# Altium PCB DPM20140124.PcbDoc (part 3 of 3)
Units mil, origin at the board's own origin, x right, y up, seen from the top; angles counter-clockwise.
Board outline 4950 x 7375 mil, 2 copper layers (Top Layer, Bottom Layer); 198 components, 330 nets, 1077 pads, 152 vias.
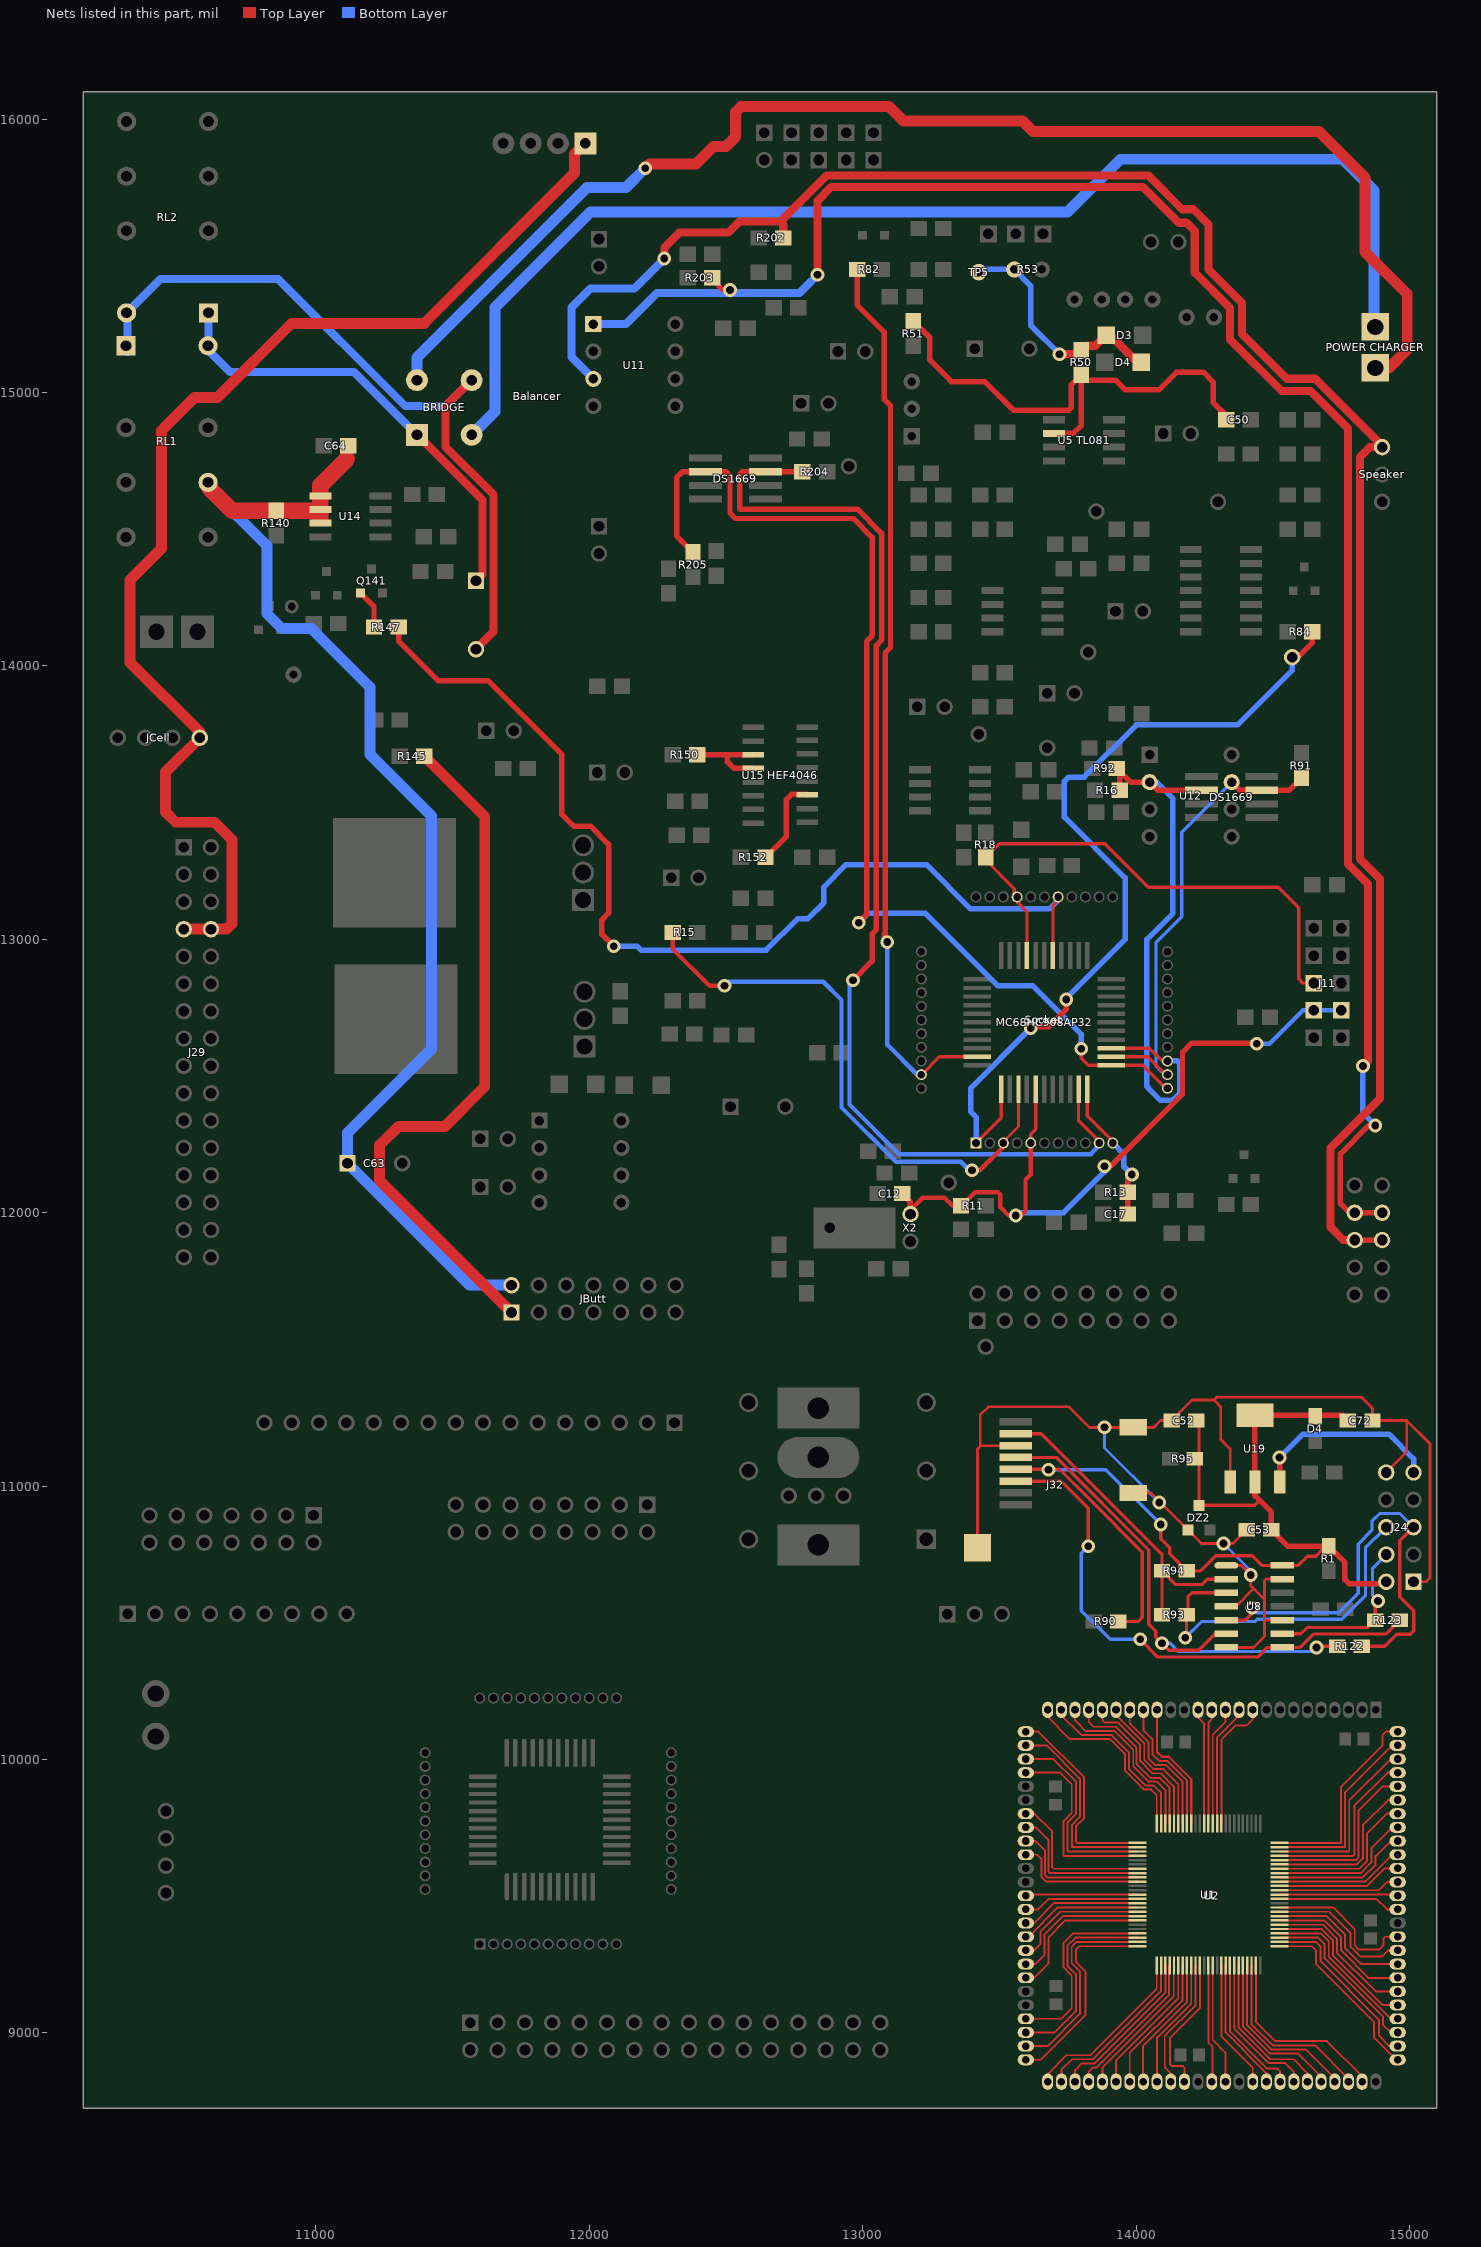
[diagram p3: the nets of this part, all layers, seen from the top]

## Via types
v1: diameter 50, hole 28, Top Layer to Bottom Layer, 152 vias

## Nets (pads, with @x,y where several pads share a name; then routed paths per layer and width w, separated by ;. In a path a pad name is that pad's centre, name@x,y a point inside that pad or via, vN(x,y) a via of type N, cw(c..) or ccw(c..) an arc to the next point about the centre after c; other vN are vias at no path point) (continued)
NetU1_10: U1.10 U2.10 | length 486.9
  Top Layer w7: U1.10@14312.09,9766.09 14312.09,10072.09 14365,10125 14405,10125 14427,10147 U2.10@14427,10182
NetU1_11: U1.11 U2.11 | length 449.3
  Top Layer w7: U1.11@14296.34,9766.09 14296.34,10081.34 14377,10162 U2.11@14377,10182
NetU1_12: U1.12 U2.12 | length 435.1
  Top Layer w7: U1.12@14280.59,9766.09 14280.59,10090.59 14327,10137 U2.12@14327,10182
NetU1_13: U1.13 U2.13 | length 420.9
  Top Layer w7: U1.13@14264.84,9766.09 14264.84,10134.84 14277,10147 U2.13@14277,10182
NetU1_14: U1.14 U2.14 | length 425.1
  Top Layer w7: U2.14@14227,10182 14227,10153 14249.09,10130.91 U1.14@14249.09,9766.09
NetU1_17: U1.17 U2.17 | length 482.3
  Top Layer w8: U2.17@14077,10182 14077,10028 14095,10010 14120,10010 14201.85,9928.15 U1.17@14201.85,9766.09
NetU1_18: U1.18 U2.18 | length 499.4
  Top Layer w7: U2.18@14027,10182 14027,10108 14060,10075 14060,10020 14085,9995 14115,9995 14186.1,9923.9 U1.18@14186.1,9766.09
NetU1_19: U1.19 U2.19 | length 519.4
  Top Layer w7: U2.19@13977,10182 13977,10133 14045,10065 14045,10005 14070,9980 14110,9980 14170.35,9919.65 U1.19@14170.35,9766.09
NetU1_20: U1.20 U2.20 | length 530.7
  Top Layer w7: U2.20@13927,10182 13927,10163 14030,10060 14030,10000 14065,9965 14100,9965 14154.61,9910.39 U1.20@14154.61,9766.09
NetU1_21: U1.21 U2.21 | length 571.2
  Top Layer w7: U2.21@13877,10182 13877,10143 13885,10135 13935,10135 14015,10055 14015,9995 14060,9950 14090,9950 14138.86,9901.14 U1.21@14138.86,9766.09
NetU1_22: U1.22 U2.22 | length 605.9
  Top Layer w7: U2.22@13827,10182 13827,10138 13845,10120 13925,10120 14002,10043 14002,9983 14052,9933 14087,9933 14123.11,9896.89 U1.22@14123.11,9766.09
NetU1_23: U1.23 U2.23 | length 631.8
  Top Layer w7: U2.23@13777,10182 13777,10143 13815,10105 13920,10105 13990,10035 13990,9975 14045,9920 14075,9920 14107.36,9887.64 U1.23@14107.36,9766.09
NetU1_24: U1.24 U2.24 | length 648.9
  Top Layer w7: U2.24@13727,10182 13727,10163 13800,10090 13910,10090 13975,10025 13975,9965 14035,9905 14065,9905 14091.61,9878.39 U1.24@14091.61,9766.09
NetU1_25: U1.25 U2.25 | length 681.9
  Top Layer w7: U2.25@13677,10182 13677,10156 13758,10075 13905,10075 13960,10020 13960,9960 14030,9890 14055,9890 14075.87,9869.13 U1.25@14075.87,9766.09
NetU1_26: U1.26 U2.26 | length 756.3
  Top Layer w7: U2.26@13597,10102 13643,10102 13810,9935 13810,9785 13780.23,9755.23 13780.23,9700 13785,9695.23 U1.26@14005,9695.23
NetU1_27: U1.27 U2.27 | length 750.7
  Top Layer w7: U2.27@13597,10052 13673,10052 13795,9930 13795,9790 13765.52,9760.52 13765.52,9679.48 U1.27@14005,9679.48
NetU1_28: U1.28 U2.28 | length 739.9
  Top Layer w7: U2.28@13597,10002 13698,10002 13780,9920 13780,9800 13750,9770 13750,9665 13751.27,9663.73 U1.28@14005,9663.73
NetU1_29: U1.29 U2.29 | length 728.7
  Top Layer w7: U2.29@13597,9952 13723,9952 13765,9910 13765,9805 13735,9775 13735,9650 13737.02,9647.98 U1.29@14005,9647.98
NetU1_32: U1.32 U2.32 | length 567.5
  Top Layer w7: U2.32@13597,9802 13628,9802 13693,9737 13693,9607 13699.26,9600.74 U1.32@14005,9600.74
NetU1_33: U1.33 U2.33 | length 544.5
  Top Layer w7: U2.33@13597,9752 13633,9752 13680,9705 13680,9590 13685.01,9584.99 U1.33@14005,9584.99
NetU1_34: U1.34 U2.34 | length 515.7
  Top Layer w7: U2.34@13597,9702 13633,9702 13667,9668 13667,9578 13675.76,9569.24 U1.34@14005,9569.24
NetU1_35: U1.35 U2.35 | length 486.9
  Top Layer w7: U2.35@13597,9652 13638,9652 13655,9635 13655,9570 13671.5,9553.5 U1.35@14005,9553.5
NetU1_38: U1.38 U2.38 | length 409.8
  Top Layer w7: U2.38@13597,9502 13601.25,9506.25 U1.38@14005,9506.25
NetU1_39: U1.39 U2.39 | length 423.9
  Top Layer w7: U2.39@13597,9452 13642,9452 13680.5,9490.5 U1.39@14005,9490.5
NetU1_40: U1.40 U2.40 | length 438.1
  Top Layer w7: U2.40@13597,9402 13627,9402 13699.76,9474.76 U1.40@14005,9474.76
NetU1_41: U1.41 U2.41 | length 452.3
  Top Layer w7: U2.41@13597,9352 13607,9352 13714.01,9459.01 U1.41@14005,9459.01
NetU1_42: U1.42 U2.42 | length 492.9
  Top Layer w7: U2.42@13597,9302 13627,9302 13650,9325 13650,9370 13723.26,9443.26 U1.42@14005,9443.26
NetU1_43: U1.43 U2.43 | length 524.6
  Top Layer w7: U2.43@13597,9252 13632,9252 13665,9285 13665,9360 13732.51,9427.51 U1.43@14005,9427.51
NetU1_44: U1.44 U2.44 | length 550.5
  Top Layer w7: U2.44@13597,9202 13627,9202 13680,9255 13680,9350 13741.76,9411.76 U1.44@14005,9411.76
NetU1_47: U1.47 U2.47 | length 720.5
  Top Layer w7: U2.47@13597,9052 13727,9052 13765,9090 13765,9210 13735,9240 13735,9330 13769.52,9364.52 U1.47@14005,9364.52
NetU1_48: U1.48 U2.48 | length 734.7
  Top Layer w7: U2.48@13597,9002 13702,9002 13780,9080 13780,9215 13750,9245 13750,9320 13778.77,9348.77 U1.48@14005,9348.77
NetU1_49: U1.49 U2.49 | length 751.8
  Top Layer w7: U2.49@13597,8952 13677,8952 13795,9070 13795,9225 13765,9255 13765,9315 13783.02,9333.02 U1.49@14005,9333.02
NetU1_50: U1.50 U2.50 | length 770.1
  Top Layer w7: U2.50@13597,8902 13652,8902 13815,9065 13815,9225 13780,9260 13780,9305 13792.28,9317.28 U1.50@14005,9317.28
NetU1_51: U1.51 U2.51 | length 640.6
  Top Layer w7: U2.51@13677,8822 13677,8850 13745.5,8918.5 13832.5,8918.5 14075.87,9161.87 U1.51@14075.87,9246.41
NetU1_52: U1.52 U2.52 | length 620.3
  Top Layer w7: U2.52@13727,8822 13727,8865 13766,8904 13842,8904 14092,9154 14092,9246.02 U1.52@14091.61,9246.41
NetU1_53: U1.53 U2.53 | length 588.8
  Top Layer w7: U2.53@13777,8822 13777,8864 13802,8889 13849,8889 14107.36,9147.36 U1.53@14107.36,9246.41
NetU1_54: U1.54 U2.54 | length 554.7
  Top Layer w7: U2.54@13827,8822 13827,8858 13843,8874 13856,8874 14121,9139 14121,9244.3 U1.54@14123.11,9246.41
NetU1_55: U1.55 U2.55 | length 532.9
  Top Layer w7: U2.55@13877,8822 13877,8873 14138,9134 14138,9245.55 U1.55@14138.86,9246.41
NetU1_56: U1.56 U2.56 | length 518.7
  Top Layer w7: U2.56@13927,8822 13927,8900 14154.61,9127.61 U1.56@14154.61,9246.41
NetU1_57: U1.57 U2.57 | length 504.5
  Top Layer w7: U2.57@13977,8822 13977,8927 14170.35,9120.35 U1.57@14170.35,9246.41
NetU1_58: U1.58 U2.58 | length 492
  Top Layer w7: U2.58@14027,8822 14025,8824 14025,8952 14186.1,9113.1 U1.58@14186.1,9246.41
NetU1_59: U1.59 U2.59 | length 476.1
  Top Layer w7: U2.59@14077,8822 14077,8983 14201.85,9107.85 U1.59@14201.85,9246.41
NetU1_60: U1.60 U2.60 | length 480.2
  Top Layer w7: U2.60@14127,8822 14127,8853 14105,8875 14105,8989 14217.6,9101.6 U1.60@14217.6,9246.41
NetU1_61: U1.61 U2.61 | length 514.3
  Top Layer w7: U2.61@14177,8822 14177,8873 14170,8880 14130,8880 14125,8885 14125,8983 14233.35,9091.35 U1.61@14233.35,9246.41
NetU1_63: U1.63 U2.63 | length 431.9
  Top Layer w7: U1.63@14264.84,9246.41 14264.84,8965.16 14280,8950 14280,8825 U2.63@14277,8822
NetU1_64: U1.64 U2.64 | length 443.6
  Top Layer w7: U1.64@14280.59,9246.41 14280.59,8974.41 14327,8928 U2.64@14327,8822
NetU1_66: U1.66 U2.66 | length 472
  Top Layer w7: U1.66@14312.09,9246.41 14312.09,8987.91 14427,8873 U2.66@14427,8822
NetU1_67: U1.67 U2.67 | length 486.2
  Top Layer w7: U1.67@14327.83,9246.41 14327.83,9002.17 14477,8853 U2.67@14477,8822
NetU1_68: U1.68 U2.68 | length 522.1
  Top Layer w7: U1.68@14343.58,9246.41 14343.58,9006.42 14480,8870 14517,8870 14527,8860 U2.68@14527,8822
NetU1_69: U1.69 U2.69 | length 549.7
  Top Layer w7: U1.69@14359.33,9246.41 14359.33,9015.67 14485,8890 14545,8890 14577,8858 U2.69@14577,8822
NetU1_70: U1.70 U2.70 | length 578.6
  Top Layer w7: U1.70@14375.08,9246.41 14375.08,9019.92 14491,8904 14576,8904 14627,8853 U2.70@14627,8822
NetU1_71: U1.71 U2.71 | length 602.7
  Top Layer w7: U1.71@14390.83,9246.41 14390.83,9024.17 14490,8925 14592,8925 14677,8840 U2.71@14677,8822
NetU1_72: U1.72 U2.72 | length 630.9
  Top Layer w7: U1.72@14406.57,9246.41 14406.57,9028.43 14495,8940 14621,8940 14727,8834 U2.72@14727,8822
NetU1_73: U1.73 U2.73 | length 662.1
  Top Layer w7: U1.73@14422.32,9246.41 14422.32,9032.68 14500,8955 14655,8955 14777,8833 U2.73@14777,8822
NetU1_74: U1.74 U2.74 | length 695.6
  Top Layer w7: U1.74@14438.07,9246.41 14438.07,9041.93 14510,8970 14698,8970 14827,8841 U2.74@14827,8822
NetU1_76: U1.76 U2.76 | length 666.4
  Top Layer w7: U1.76@14524.69,9317.28 14642.72,9317.28 14659,9301 14659,9252 14871,9040 14871,8983 14952,8902 U2.76@14957,8902
NetU1_77: U1.77 U2.77 | length 655.7
  Top Layer w7: U1.77@14524.68,9333.02 14657.98,9333.02 14675,9316 14675,9262 14888,9049 14888,8991 14927,8952 U2.77@14957,8952
NetU1_78: U1.78 U2.78 | length 624
  Top Layer w7: U1.78@14524.68,9348.77 14666.23,9348.77 14690,9325 14690,9273 14904,9059 14904,9029 14931,9002 U2.78@14957,9002
NetU1_79: U1.79 U2.79 | length 595.2
  Top Layer w7: U1.79@14524.68,9364.52 14675.48,9364.52 14705,9335 14705,9278 14931,9052 U2.79@14957,9052
NetU1_80: U1.80 U2.80 | length 548.4
  Top Layer w7: U1.80@14524.68,9380.27 14679.73,9380.27 14720,9340 14720,9284 14902,9102 14925,9102
NetU1_81: U1.81 U2.81 | length 563.3
  Top Layer w7: U1.81@14524.68,9396.02 14683.98,9396.02 14735,9345 14735,9294 14877,9152 U2.81@14957,9152
NetU1_82: U1.82 U2.82 | length 548.1
  Top Layer w7: U1.82@14524.68,9411.76 14688.24,9411.76 14750,9350 14750,9302 14851,9201 14956,9201 U2.82@14957,9202
NetU1_83: U1.83 U2.83 | length 534.3
  Top Layer w7: U1.83@14524.68,9427.51 14697.49,9427.51 14765,9360 14765,9310 14823,9252 U2.83@14957,9252
NetU1_84: U1.84 U2.84 | length 538.3
  Top Layer w7: U1.84@14524.68,9443.26 14706.74,9443.26 14785,9365 14785,9315 14820,9280 14900,9280 14922,9302 U2.84@14957,9302
NetU1_85: U1.85 U2.85 | length 565.4
  Top Layer w7: U1.85@14524.68,9459.01 14720.99,9459.01 14800,9380 14800,9320 14815,9305 14890,9305 14905,9320 14905,9345 14912,9352 U2.85@14957,9352
NetU1_87: U1.87 U2.87 | length 448.3
  Top Layer w7: U1.87@14524.68,9490.5 14879.5,9490.5 14918,9452 U2.87@14957,9452
NetU1_88: U1.88 U2.88 | length 434.1
  Top Layer w7: U1.88@14524.68,9506.25 14952.75,9506.25 U2.88@14957,9502
NetU1_89: U1.89 U2.89 | length 444.7
  Top Layer w7: U1.89@14524.68,9522 14887,9522 14917,9552 U2.89@14957,9552
NetU1_90: U1.90 U2.90 | length 458.9
  Top Layer w7: U1.90@14524.68,9537.75 14845.75,9537.75 14910,9602 U2.90@14957,9602
NetU1_91: U1.91 U2.91 | length 473.1
  Top Layer w7: U1.91@14524.68,9553.5 14838.5,9553.5 14937,9652 U2.91@14957,9652
NetU1_92: U1.92 U2.92 | length 505.5
  Top Layer w7: U1.92@14524.68,9569.24 14829.24,9569.24 14876,9616 14876,9647 14931,9702 U2.92@14957,9702
NetU1_93: U1.93 U2.93 | length 531.9
  Top Layer w7: U1.93@14524.68,9584.99 14821.96,9584.99 14861,9624.03 14861,9676 14937,9752 U2.93@14957,9752
NetU1_94: U1.94 U2.94 | length 574.3
  Top Layer w7: U1.94@14524.68,9600.74 14815.74,9600.74 14845,9630 14845,9730 14917,9802 U2.94@14957,9802
NetU1_95: U1.95 U2.95 | length 600.7
  Top Layer w7: U1.95@14524.68,9616.49 14807.49,9616.49 14829.5,9638.5 14829.5,9759.5 14922,9852 U2.95@14957,9852
NetU1_96: U1.96 U2.96 | length 644.2
  Top Layer w7: U1.96@14524.68,9632.24 14803.24,9632.24 14814,9643 14814,9814 14902,9902 U2.96@14957,9902
NetU1_97: U1.97 U2.97 | length 662.5
  Top Layer w7: U1.97@14524.68,9647.98 14793.98,9647.98 14799,9653 14799,9831 14920,9952 U2.97@14957,9952
NetU1_98: U1.98 U2.98 | length 681.4
  Top Layer w7: U1.98@14524.68,9663.73 14778.73,9663.73 14780,9665 14780,9851 14931,10002 U2.98@14957,10002
NetU1_99: U1.99 U2.99 | length 703.8
  Top Layer w7: U1.99@14524.69,9679.48 14764.48,9679.48 14765,9680 14765,9880 14937,10052 U2.99@14957,10052
NetU1_100: U1.100 U2.100 | length 742.9
  Top Layer w7: U1.100@14524.68,9695.23 14749.77,9695.23 14750,9695.46 14750,9900 14902,10052 14902,10090 14914,10102 U2.100@14957,10102
NetU50_2: 
NetU50_11: 
NetU50_12: 
NetU50_13: 
NetU50_14: 
OPEINTE: "U5 TL081.2" C50.1 R50.2 R51.1 | length 1902.2
  Top Layer w20: R51.1@13185,15260 13186.94,15260 13245,15201.94 13245,15120 13325,15040 13446,15040 13551,14935 13754,14935 13763,14944 13763,15028 R50.2@13800,15065 ; 13700,14850 13770,14850 13800,14880 R50.2@13800,15065 ; C50.1@14330,14900 14330,14915 14283,14962 14283,15037 14246,15074 14149,15074 14085,15010 13959.83,15010 13924.83,15045 13820,15045 R50.2@13800,15065
OSC1: C12.1 J11.7 J11.8 MC68HC908AP32.5 R11.2 Socket.5 X2.2 | length 2692.8
  Top Layer w12: Socket.5@13615,12255 13615,12286.89 13633,12304.89 MC68HC908AP32.5@13633,12451
  Top Layer w16: X2.2@13175,11995 13175,12010 13220,12055 13300,12055 13330,12025 R11.2@13360,12025 13360.89,12025 13410.89,12075 13495,12075 13503.5,12066.5 13503.5,12020.5 13534,11990 v1(13560,11990) 13580,11990 13596,12006 13596,12121 13615,12140 Socket.5@13615,12255
  Top Layer w20: C12.1@13145,12070 13175,12040 X2.2@13175,12010 ; v1(13885,12170) 13906.21,12170 14170,12433.79 14170,12586.43 14203.57,12620 14440,12620 v1(14442,12618)
  Bottom Layer w16: v1(14442,12618) 14488,12618 14610,12740 J11.7@14650,12740 J11.8@14750,12740
  Bottom Layer w20: v1(13560,11990) 13570,12000 13735,12000 13885,12150 v1(13885,12170)
PORTA0: J11.5 MC68HC908AP32.30 R18.1 Socket.30 | length 2005.4
  Top Layer w12: MC68HC908AP32.30@13601,12941 13601,13101 13565,13137 Socket.30@13565,13155 13555,13165 13555,13185 13450,13290 R18.1@13450,13300 13499,13349 13886,13349 14045,13190 14520.63,13190 14595,13115.63 14595,12855 14610,12840 J11.5@14650,12840
PULSEAMPL: D3.2 D4.1@14020,15110 R50.1 R53.2 TP5.1 | length 882.9
  Top Layer w30: v1(13720,15140) 13794,15140 13825,15171 13852,15171 D3.2@13891,15210 13905,15210 14005,15110 D4.1@14020,15110
  Bottom Layer w20: TP5.1@13425,15440 13435,15450 R53.2@13555,15450 13615,15390 13615,15245 v1(13720,15140)
PULSO: MC68HC908AP32.43 pad.16 R82.2 Socket.43 | length 3307.3
  Top Layer w12: Socket.43@13215,12505 13215.91,12505 13280.91,12570 MC68HC908AP32.43@13419,12570
  Top Layer w20: R82.2@12985,15445 R82.2@12980,15450 12980,15320 13080,15220 13080,14975 13102,14953 13102,14067 13082,14047 13082,13021.75 13080,13019.75 13080,13000 pad.16@13090,12990
  Bottom Layer w16: pad.16@13090,12990 13090,12615 13200,12505 Socket.43@13215,12505
PWR1: C63.1 C64.1 JButt.2 R140.1 RL1.6 U14.1 U14.2 U14.3 | length 4475.8
  Top Layer w60: RL1.6@10612,14649 10694,14567 R140.1@10856,14567 11012,14567 U14.2@11017,14572 ; 11017,14541 U14.2@11017,14572 ; 11114,14757 11017,14660 U14.1@11017,14622 U14.2@11017,14572
  Bottom Layer w40: RL1.6@10612,14649 10820.95,14440.05 10820.95,14192 10876.95,14136 10984,14136 11198,13922 11198,13676 11423,13451 11423,12599 11116,12292 C63.1@11116,12181 11562,11735 JButt.2@11716,11735
PWR2: JButt.1 R145.1 | length 2586.2
  Top Layer w40: R145.1@11397,13670 11618,13449 11618,12461 11473,12316 11302,12316 11233,12247 11233,12118 JButt.1@11716,11635
REFIND: 
RESETM: C17.1 MC68HC908AP32.11 R13.1 Socket.11 | length 529.7
  Top Layer w12: MC68HC908AP32.11@13822,12451 13822,12354.57 13915,12261.57 Socket.11@13915,12255
  Top Layer w20: C17.1@13970,11995 R13.1@13970,12075 13970,12125 v1(13985,12140)
  Bottom Layer w20: Socket.11@13915,12255 13955,12215 13955,12170 v1(13985,12140)
RETENCION_POWER: MC68HC908AP32.27 R147.1 Socket.27 | length 3765.9
  Top Layer w12: MC68HC908AP32.27@13696,12941 13696,13122 13715,13141 Socket.27@13715,13155
  Top Layer w20: R147.1@11303,14142 11303,14091 11449,13945 11631,13945 11900,13676 11900,13457 11943,13414 12005,13414 12071.5,13347.5 12071.5,13095.8 12046,13070.3 12046,13019 v1(12090,12975)
  Bottom Layer w20: v1(12090,12975) 12175,12975 12190,12960 12647.57,12960 12763.57,13076 12800.3,13076 12858,13133.7 12858,13191.08 12939.92,13273 13233.17,13273 13395.17,13111 13683.23,13111 13715,13142.77 Socket.27@13715,13155
RETPOW1: Q141.1 R147.2 | length 145.3
  Top Layer w20: Q141.1@11164,14267 11213,14218 R147.2@11213,14142
RVCO: "U15 HEF4046.11" R152.2 | length 327
  Top Layer w20: R152.2@12645,13300 12720,13375 12720,13510 12740,13530 12794.96,13530 12796.85,13528.11
SAMPLE: MC68HC908AP32.1 pad.0@14571,14032 R84.2 Socket.1 | length 3110.2
  Top Layer w12: Socket.1@13415,12255 13415,12255.91 13507,12347.91 MC68HC908AP32.1@13507,12451
  Top Layer w20: v1(13615,12675) 13620,12680 13680,12680 13745,12745 v1(13745,12780) ; pad.0@14571,14032 14592,14032 14645,14085 R84.2@14645,14125
  Bottom Layer w20: Socket.1@13415,12255 13415,12350 13395,12370 13395,12455 v1(13615,12675) ; v1@13742.5,12782.5 13960,13000 13960,13225 13738,13447 13738,13578 13753,13593 13809.92,13593 14000.92,13784 14371,13784 14571,13984 pad.0@14571,14032
SCK: J24.5 R122.2 U8.5 | length 1645.5
  Top Layer w12: U8.5@14330.28,10510 14400,10510 v1@14430,10540 ; v1@14430,10555 v1@14430,10560 ; R122.2@14826,10414 14909,10414 14953,10458 15003,10458 15016,10471 15016,10544 14965,10595 14965,10800 J24.5@15015,10850
  Bottom Layer w12: v1(14425,10555) 14443,10537 14742,10537 14813,10608 14813,10788.06 14863,10838.06 14863,10872 14891,10900 14965,10900 J24.5@15015,10850
SCK_: J32.5 R122.1 U8.6 | length 1920.3
  Top Layer w12: J32.5@13560,11104.92 13708.5,11104.92 14047,10766.42 14047,10495 14072,10470 14072,10448 v1(14095,10425) 14120,10400 14230,10400 14290,10460 U8.6@14330.28,10460 ; v1(14660,10410) 14664,10414 R122.1@14736,10414
  Bottom Layer w12: v1(14095,10425) 14125,10425 14155,10395 14645,10395 v1(14660,10410)
SD_GND: C52.2@14130,11240 C53.2@14405,10840 C72.2 DZ2.1 J24.1 J24.10 J32.6 J32.9 U8.1 U8.4 U8.7 U8.10 U8.13 U19.1 | length 5413.1
  Top Layer w10: J32.9@13420,10774.84 13420,11135 13433.23,11148.23 ; J32.6@13560,11148.23 13433.23,11148.23 ; J32.9@13990,10974.84 14055.16,10974.84 DZ2.1@14190,10840 14240,10790 v1(14320,10790) 14355,10790 C53.2@14405,10840 ; U8.7@14330.28,10410 14430,10410 14470,10450 14470,10510 ; U8.4@14330.28,10560 14365,10560 14430,10625 ; U8.1@14330.28,10710 14385,10710 v1(14420,10675) 14420,10635 14430,10625 ; U19.1@14344.45,11015 14344.45,11135.55 14310,11170 14310,11290 14285,11315 ; U8.10@14535,10510 14470,10510 ; U8.13@14535,10660 14475,10660 14470,10655 14470,10585 ; J24.10@14915,11050 14990,11125 14990,11240 ; J24.1@15015,10650 15060,10650 15075,10665 15075,11155 14990,11240 ; 13433.23,11148.23 13430,11151.46 13430,11260 13460,11290 13755,11290 13830.16,11214.84 J32.9@13990,11214.84 14064.84,11214.84 14090,11240 C52.2@14130,11240 14205,11315 14285,11315 ; 14285,11315 14295,11325 14825,11325 14865,11285 C72.2@14865,11240 14990,11240 ; 14430,10625 14470,10585 ; 14470,10510 14470,10585
  Bottom Layer w10: v1(13885,11215) 13885,11140 v1(14085,10940) ; v1(14320,10790) 14420,10690 v1(14420,10675)
SDI: J24.6 R93.2 U8.3 | length 1305.9
  Top Layer w12: v1(14180,10445) 14185,10450 R93.2@14185,10530 14190,10535 14190,10595 14205,10610 U8.3@14330.28,10610
  Bottom Layer w12: v1(14180,10445) 14240,10505 14435.81,10505 14443.81,10513 14753,10513 14839,10599 14839,10774 J24.6@14915,10850
SDI_: J32.7 R93.1 R94.1 U8.2 | length 1204.5
  Top Layer w12: J32.7@13560,11191.54 13653,11191.54 14090.54,10754 14095,10754 R94.1@14095,10690 ; R93.1@14095,10530 R94.1@14095,10690 ; U8.2@14330.28,10660 14260,10660 14240,10640 14145,10640 R94.1@14095,10690
SDO: J24.4 R123.2 U8.9 | length 629.5
  Top Layer w12: U8.9@14535,10460 14603,10460 14626,10483 14848,10483 R123.2@14875,10510 ; R123.2@14867.5,10517.5 14875,10525 14875,10570 v1(14885,10580)
  Bottom Layer w12: v1(14885,10580) 14865,10600 14865,10700 J24.4@14915,10750
SDO_: J32.3 R123.1 U8.8 | length 1991.8
  Top Layer w12: J32.3@13560,11018.31 13726.69,11018.31 13825,10920 13825,10784 v1@13823,10782 ; v1(14015,10440) 14080,10375 14445,10375 14480,10410 U8.8@14535,10410 14600,10410 14649,10459 14914,10459 R123.1@14965,10510 ; R123.1@14957.5,10517.5 R123.1@14965,10525
  Bottom Layer w12: v1(13825,10780) 13800,10755 13800,10545 13905,10440 v1(14015,10440)
SENS+: DS1669.2@14240,13545 MC68HC908AP32.14 R16.2 R92.1@13930,13625 Socket.14 U12.2 | length 2138.7
  Top Layer w12: MC68HC908AP32.14@13910,12602 14048.2,12602 14095.2,12555 Socket.14@14115,12555
  Top Layer w20: R92.1@13930,13625 R92.1@13940,13615 ; R16.2@13940,13545 R92.1@13940,13615 ; DS1669.2@14230,13545 14080,13545 U12.2@14050,13575 13980,13575 R92.1@13940,13615
  Bottom Layer w20: U12.2@14050,13575 14075,13575 14135,13515 14135,13095 14040,13000 14040,12463.08 14044,12459.08 14044,12456 14089,12411 14133.23,12411 14159,12436.77 14159,12546 14150,12555 Socket.14@14115,12555
SENS-: DS1669.7@14460,13545 MC68HC908AP32.13 R91.1 Socket.13 U12.7 | length 1725.6
  Top Layer w12: MC68HC908AP32.13@13910,12570 14043.43,12570 14108.43,12505 Socket.13@14115,12505
  Top Layer w20: U12.7@14350,13575 14380,13545 DS1669.7@14460,13545 14560,13545 R91.1@14605,13590
  Bottom Layer w12: Socket.13@14115,12505 14105.6,12505 14073,12537.6 14073,12988 14167,13082 14167,13392 U12.7@14350,13575
SPKR_N: pad.5@14900,11900 pad.20 R202.2 Speaker.3 U11.3 | length 7350.2
  Top Layer w20: pad.20@14799,11900 pad.20@14800,11900 pad.5@14900,11900
  Top Layer w30: v1(12275,15490) 12275,15530 12330,15585 12510,15585 12550,15625 12700,15625 ; R202.2@12710,15565 12710,15615 12700,15625 ; pad.20@14799,11900 14758,11900 14711,11947 14711,12236 14892,12417 14892,13221.23 14819,13294.23 14819,14764 14855,14800 Speaker.3@14900,14800 14900,14806.24 14656.24,15050 14552,15050 14388,15214 14388,15327 14265,15450 14265,15615 14210,15670 14168,15670 14045,15793 12868,15793 12700,15625
  Bottom Layer w30: U11.3@12015,15050 11935,15130 11935,15310 12005,15380 12165,15380 v1(12275,15490)
SPKR_P: pad.21 pad.23 R203.2 U11.1 | length 6840
  Top Layer w20: R203.2@12445,15420 12490,15375 v1(12515,15375) ; v1(14875,12319) 14851,12319 14747,12215 14747,12033 14780,12000 pad.21@14800,12000 pad.23@14900,12000
  Top Layer w30: v1(12835,15430) 12835,15701 12885,15751 14026,15751 14156,15621 14184,15621 14215,15590 14215,15437.77 14344,15308.77 14344,15194 14533,15005 14637.77,15005 14775,14867.77 14775,13275 14848,13202 14848,12554.45 v1(14830,12536.45)
  Bottom Layer w20: v1(14830,12536.45) 14830,12364 v1(14875,12319)
  Bottom Layer w30: U11.1@12015,15250 12135,15250 12248.5,15363.5 12503.5,15363.5 v1(12515,15375) 12526,15364 12769,15364 12813,15408
TIMEROUT: MC68HC908AP32.3 R15.2 Socket.3 | length 2116.4
  Top Layer w10: Socket.3@13515,12255 13515,12260 13570,12315 MC68HC908AP32.3@13570,12451
  Top Layer w16: R15.2@12305,13025 12305,12965 12440,12830 v1(12495,12830) ; v1(13400,12155) 13428.77,12155 13515,12241.23 Socket.3@13515,12255
  Bottom Layer w16: v1(12495,12830) 12510,12845 12856,12845 12923,12778 12923,12385 13122,12186 13359,12186 13390,12155 v1(13400,12155)
TRANSISBASE: 
USD_+3.3: C52.1@14220,11240 C53.1@14495,10840 C72.1 D4.1@14655,11255 DZ2.3 J24.2 J32.4 R1.2 R90.2@13935,10505 R94.2 R95.2 U8.14 U19.2 | length 4071.2
  Top Layer w12: J32.4@13560,11061.62 13720.15,11061.62 13830.38,10951.38 13830.62,10951.38 14023,10759 14023,10520 14008,10505 R90.2@13935,10505 ; v1(14090,10860) 14090,10808 14123,10775 14123,10752 R94.2@14185,10690 14236,10690 14291,10745 14425,10745 14460,10710 U8.14@14535,10710 14594.05,10710 14628.05,10744 14658,10744 14694,10780 R1.2@14705,10780 ; C52.1@14220,11240 14230,11230 DZ2.3@14230,10930 14435,10930 14447.5,10942.5
  Top Layer w20: R1.2@14694,10780 14555,10780 C53.1@14495,10840 14495,10905 14435,10965 U19.2@14435,11259.09 14755.91,11259.09 C72.1@14775,11240 ; R1.2@14707,10780 R1.2@14705,10780 14764,10721 14764,10658.5 14780,10642.5 14907.5,10642.5 J24.2@14915,10650
  Bottom Layer w12: v1(13680,11060) 13890,11060 v1(14090,10860)
USD_+5: J24.9 U19.3 | length 702.7
  Top Layer w20: v1(14525,11105) 14525.55,11104.45 U19.3@14525.55,11015
  Bottom Layer w20: v1(14525,11105) 14610,11190 14925,11190 15015,11100 J24.9@15015,11050
V1: "POWER CHARGER.2" BRIDGE.1 | length 4936.3
  Top Layer w40: v1(12205,15820) 12220.21,15835.21 12390,15835.21 12454.79,15900 12500,15900 12535,15935 12535,16025 12556,16046 13097,16046 13150,15993 13585,15993 13623,15955 14669,15955 14838,15786 14838,15514 14992,15360 14992,15157 14925,15090 14875,15090
  Bottom Layer w40: BRIDGE.1@11370,15045 11370,15128 11992,15750 12135,15750 v1(12205,15820) v1@12210,15825
V2: "POWER CHARGER.1" BRIDGE.3 | length 4488.2
  Bottom Layer w40: BRIDGE.3@11570,14845 11655,14930 11655,15310.46 12004.54,15660 13750,15660 13943,15853 14755.23,15853 14870,15738.23 14870,15245 14875,15240
V+: Balancer.2 BRIDGE.4 RL1.8 RL2.1 | length 1672.5
  Top Layer w30: BRIDGE.4@11370,14845 11371.6,14845 11610,14606.6 11610,14335 Balancer.2@11586,14311
  Bottom Layer w30: RL2.1@10608,15291 10608,15151 RL1.8@10611,15148 ; RL1.8@10612,15149 10686,15075 11140,15075 BRIDGE.4@11370,14845
V-: Balancer.1 BRIDGE.2 RL1.1 RL2.8 | length 2813.7
  Top Layer w30: BRIDGE.2@11570,15045 11475,14950 11475,14801 11650,14626 11650,14125 Balancer.1@11586,14061
  Bottom Layer w30: RL2.8@10308,15291 RL2.8@10312,15295 ; RL1.1@10312,15149 RL2.8@10312,15295 ; BRIDGE.2@11570,15045 11475,14950 11327.23,14950 10862.23,15415 10432,15415 RL2.8@10312,15295
VCO_OUT: "U15 HEF4046.3" "U15 HEF4046.4" R150.2 | length 335.4
  Top Layer w20: R150.2@12395,13675 12505,13675 ; 12600,13624.96 12599.96,13625 12530,13625 12505,13650 12505,13675 ; 12600,13674.96 12599.96,13675 12505,13675
VOL+: DS1669.2@12425,14710 MC68HC908AP32.12 pad.17 R205.1 Socket.12 | length 4061.9
  Top Layer w12: v1(13800,12600) 13800,12565 13826,12539 MC68HC908AP32.12@13910,12539 14024.43,12539 14108.43,12455 Socket.12@14115,12455
  Top Layer w20: R205.1@12380,14415 12320,14475 12320,14689 12341,14710 DS1669.2@12425,14710 12500,14710 12515,14695 12515,14560 12536,14539 12966,14539 13035,14470 13035,14110 13015,14090 13015,13090 pad.17@12986,13061
  Bottom Layer w20: pad.17@12986,13061 13020,13095 13230,13095 13495,12830 13622.43,12830 13800,12652.43 13800,12627.85
VOL-: DS1669.7@12645,14710 MC68HC908AP32.10 R204.1 Socket.10 | length 4273.3
  Top Layer w12: MC68HC908AP32.10@13790,12451 13790,12336.57 13865,12261.57 Socket.10@13865,12255
  Top Layer w20: R204.1@12780,14710 DS1669.7@12645,14710 12560,14710 12550,14700 12550,14575 12552,14573 12982,14573 13070,14485 13070,14095 13050,14075 13050,13035 13035,13020 13035,12920 v1(12965,12850)
  Bottom Layer w16: v1(12965,12850) 12952,12837 12952,12395.6 13133.6,12214 13833.4,12214 ; 13832.4,12213 13833.4,12214 ; 13836.8,12214 13833.4,12214 ; 13854.7,12235.3 13833.4,12214
VSS: Balancer.10 J29.7 J29.8 JCell.4 | length 4408.5
  Top Layer w40: J29.7@10517,13037 J29.8@10617,13037 10673,13037 10693,13057 10693,13364 10629,13428 10488,13428 10451,13465 10451,13612 JCell.4@10576,13737 10576,13758 10321,14013 10321,14314 10436,14429 10436,14860 10447,14871 10447,14872 10556,14981 10640,14981 10912,15253 11397,15253 11947,15803 11947,15872 Balancer.10@11986,15911 ; Balancer.10@11988.33,15908.67 11990,15910.35 Balancer.10@11990,15915
pads on no net: "U3 HCF4066.4" "U3 HCF4066.10" "U5 TL081.8" "U6 TL082.1" "U15 HEF4046.1" "U15 HEF4046.2" "U15 HEF4046.10" "U15 HEF4046.12" "U15 HEF4046.13" "U15 HEF4046.15" DS1669.3 DZ2.2 DZ140.2 J1.7@13720,11605 J1.8@13720,11705 J1.9@13820,11605 J1.10@13820,11705 J1.13@10392,10893 J1.14@10392,10793 J10.13 J10.14 J10.15 J10.16 J10.17 J10.18 J10.19 J10.20 J10.21 J10.22 J10.23 J10.24 J10.25 J10.26 J10.27 J10.28 J10.29 J10.30 J10.31 J10.32 J11.6 J29.13 J29.14 J29.15 J29.16 J29.17 J29.18 J29.19 J29.20 J29.21 J29.22 J29.23 J29.24 J29.25 J29.26 J29.27 J29.28 J29.29 J29.30 J29.31 J29.32 JButt.13 JButt.14 LED.5 LED.6 RL1.3 RL1.5 RL2.3 RL2.6 U12.3 U16.1 U16.4 U16.6 U16.7
copper on no net:
  other v1: 12206,9404 11505,9419 11849,9765 11510,10125 12191,10128

## Polygon pours and split planes (outlines as drawn)
no net on Top Solder (hatched 90Degree grid 10 track 10): 13150,11975 13150,11725 12800,11725 12750,11775 12750,11925 12750,11975 13150,11975 13050,11975
SD_GND on Top Layer "Top Layer-No Net" (solid, remove dead copper, pour order 7): 13350,11350 13350,10360 13355,10355 13360,10350 14685,10350 15095,10350 15100,10345 15100,11345 13355,11345
GND on Top Layer "Top Layer-No Net" (solid, remove dead copper, pour order 11): 13500,10275 13500,8725 15050,8725 15050,10275 13500,10275
GND on Top Layer "Top Layer-No Net" (solid, remove dead copper, pour order 21): 11348,10280 11348,9275 11346,9273 11349,9270 12350,9270 12350,10277 12348,10279 12347,10280 11346,10280
NETA on Top Layer "Top Layer-No Net" (solid, remove dead copper, pour order 27): 10675,11320 12451,11320 12453,11318 12453,10677 10685,10677 10679,10671 10679,11316 10681,11318
NetJ9_1 on Top Layer "Top Layer-No Net" (solid, remove dead copper, pour order 31): 10153.01,10380 10153.01,8747 10145,8739 10151.01,8733 10230.16,8733 13423.97,8733 13440,8717 13432.99,8724 13432.99,9370 13432.99,10367 13421.97,10378 13420.97,10379 10154.02,10379
GNDA on Top Layer "Top Layer-No Net" (solid, remove dead copper, pour order 35): 10151,16101 10151,11466 10153,11464 10156,11461 11508,11461 15097,11461 15098,11460 15096,11462 15096,16101 15095,16100 14619,16100 10150,16100
GND2 on Top Layer "Top Layer-No Net" (solid, remove dead copper, pour order 37): 10221,11004 10225,11000 10225,10422 13631,10422 13632,10423 13619,10436 13619,10998 10219,10998
SD_GND on Bottom Layer "Top Layer-No Net" (solid, remove dead copper, pour order 9): 13357,11337.33 13362,11332.33 13362,10337.33 15092,10337.33 15102,10327.33 15097,10332.33 15097,11342.33 13352,11342.33
GND on Bottom Layer "Top Layer-No Net" (solid, remove dead copper, pour order 13): 13500,10275 13500,8725 15047,8725 15047,10275 13500,10275
GND on Bottom Layer "Top Layer-No Net" (solid, remove dead copper, pour order 23): 11349,10279 11349,9274 11348,9273 11351,9270 12350,9270 12350,10262 12342,10270 12337,10275 11348,10275
NETA on Bottom Layer "Top Layer-No Net" (solid, remove dead copper, pour order 25): 10671,11322 12445,11322 12451,11316 12449,11314 12449,10708 12449,10677 12445,10673 11405,10673 10698,10673 10675,10696 10669,10702 10669,11320
NetJ9_1 on Bottom Layer "Top Layer-No Net" (solid, remove dead copper, pour order 29): 10149,10392 10157.01,10384 10157.01,8727 13430.99,8727 13439,8735 13440,8736.01 13440,9699.58 13440,10366.99 13430.99,10375.99 13422.97,10384 10152,10384
GNDA on Bottom Layer "Top Layer-No Net" (solid, remove dead copper, pour order 33): 10159,16092 10159,11455 10164,11450 10166,11448 10630,11448 15094,11448 15100,11442 15109,11451 15109,16099 15101,16091 10159,16091
GND2 on Bottom Layer "Top Layer-No Net" (solid, remove dead copper, pour order 39): 10221,11006 10221,10423 13622,10423 13629,10430 13633,10434 13633,10619 13633,10993 13604,11022 13592,11010 10220,11010

## Keep-outs
Keep-Out Layer:
  lines w10: 10160,15900 cw(c10360,15900) 10360,16100 14900,16100 cw(c14900,15900) 15100,15900 15100,11655 cw(c14900,11655) 14900,11455 14350,11455 14350,11350 15000,11350 cw(c15000,11250) 15100,11250 15100,10700 15100,10450 cw(c15000,10450) 15000,10350 14335,10350 14335,10270 14843.02,10270 ; 10160,15915 10160,11650 ccw(c10360,11650) 10360,11450 10950,11450 10950,11325 10765,11325 ; 10470,9350 10480,9350 ; 10500,10420 10500,10375 11100,10375 11100,10425 10500,10425 ; 10770,11050 10825,11050 10825,11000 10275,11000 ccw(c10275,10950) 10225,10950 10225,10500 ccw(c10300,10500) 10300,10425 10450,10425 10450,10375 10225,10375 ccw(c10225,10300) 10150,10300 10150,9425 ccw(c10225,9425) 10225,9350 10305,9350 10480,9350 ; 10775,11050 cw(c10775,11150) 10675,11150 10675,11225 cw(c10775,11225) 10775,11325 ; 10919.94,15499.96 10919.94,15599.37 ; 10920,13605 ccw(c11000,13605) 11080,13605 ; 10920.01,15500 ccw(c11000.01,15500) 11080.01,15500.03 ; 10920.22,15598.92 cw(c11000.01,15685.85) 11079.95,15599.05 ; 10920.49,11598.35 10920.49,11697.77 ; 10920.49,13598.35 10920.49,13697.77 ; 10921,11600 ccw(c11001,11600) 11081,11600 ; 10921.22,11697.92 cw(c11001.01,11784.85) 11080.95,11698.05 ; 10921.22,13698.92 cw(c11001.01,13785.85) 11080.95,13699.05 ; 11074.25,8755.75 11095,8735 13250,8735 ccw(c13250,8910) 13425,8910 ; 11075,8755 10480,9350 ; 11080.02,15499.87 11080.03,15598.7 ; 11080.81,11598.23 11080.81,11699.11 ; 11080.81,13598.23 11080.81,13699.11 ; 11275,10770 11275,10925 ccw(c11150,10925) 11150,11050 10860,11050 10860,11000 11075,11000 11100,11000 cw(c11100,10950) 11150,10950 11150,10825 ccw(c11350,10825) 11350,10625 11775,10625 11775,10675 11375,10675 cw(c11375,10775) 11275,10775 ; 11299.92,9375.08 ccw(c11450,9375.08) 11450,9225 11750,9225 11750,9275 11450,9275 cw(c11450,9375) 11350,9375 11350,10225 cw(c11400,10225) 11400,10275 11575,10275 11575,10325 11400,10325 ccw(c11400,10225) 11300,10225 11300,9375 ; 11809,11325 11000,11325 11000,11450 12433.77,11450 ; 11810,11325 12350,11325 cw(c12350,11225) 12450,11225 12450,11045 12521,11045 12521,11323.38 cw(c12577.59,11323.38) 12577.59,11379.97 ; 12350,9320 12350,10225 ccw(c12300,10225) 12300,10275 11625,10275 11625,10325 12300,10325 cw(c12300,10225) 12400,10225 12400,9325 cw(c12300,9325) 12300,9225 11800,9225 11800,9275 12300,9275 ccw(c12300,9325) 12350,9325 ; 12350,10675 ccw(c12350,10775) 12450,10775 12450,11000 12514,11000 12514,10783.09 ; 12355,10675 11800,10675 11800,10625 12450,10625 12850,10625 12850,10675 12621.36,10675 cw(c12621.36,10783.09) 12513.27,10783.09 ; 12434.6,11450 ccw(c12433.77,11649.57) 12574.89,11508.45 ; 12570.83,11504.51 cw(c12693.84,11432.5) 12690.87,11575 ; 12577.59,11380 13238,11380 ; 12693.84,11575 12980,11575 cw(c12980,11425) 13100.63,11514.16 ; 12900,14075 cw(c12800,14075) 12800,13975 12700,13975 cw(c12700,14075) 12600,14075 12600,14375 cw(c12700,14375) 12700,14475 12800,14475 cw(c12800,14375) 12900,14375 12900,14080 ; 13104.37,11510.84 ccw(c13225,11600) 13225,11450 14300,11450 14300,11350 13400,11350 ccw(c13400,11300) 13350,11300 13350,11200 13288,11200 ; 13237,11380 cw(c13237,11330) 13287,11330 13287,11200 ; 13250,10375 cw(c13250,10200) 13425,10200 13425,9800 13500,9800 13500,10225 cw(c13550,10225) 13550,10275 14300,10275 14300,10350 13961.41,10350 cw(c13961.41,10611.41) 13700,10611.41 13700,10625 ccw(c13650,10625) 13650,10675 13500,10675 13500,10625 13530,10625 ; 13255,10375 12875,10375 12875,10425 13525,10425 ccw(c13525,10525) 13525,10625 ; 13289.77,11150 13289.77,10765.67 cw(c13199.1,10765.67) 13199.1,10675 12875,10675 12875,10625 13450,10625 13475,10625 13475,10675 13400,10675 cw(c13400,10725) 13350,10725 13350,11150 13292,11150 ; 13425,8915 13425,9025 13500,9025 13500,8775 ccw(c13550,8775) 13550,8725 14045,8725 ; 14050,8725 14995,8725 ccw(c14995,8775) 15045,8775 15045,10070 ccw(c14845.02,10070) 14845.02,10269.98 ; 14420,11696 14420,11600 ccw(c14500,11600) 14580,11600 ; 14420,15599.42 14420,15500 ccw(c14500,15500) 14580,15500 14580,15600 ; 14420,15600 cw(c14499.96,15686.78) 14579.9,15599.98 ; 14420.22,11694.92 cw(c14500.01,11781.85) 14579.95,11695.05 ; 14545,10350 14995,10350 ; 14579.6,11599.02 14579.6,11695 ; 10225,12250 ccw(c10275,12250) 10325,12250 10325,12450 ccw(c10275,12450) 10225,12450 10225,12250 ; 10225,13120 ccw(c10275,13120) 10325,13120 10325,13320 ccw(c10275,13320) 10225,13320 10225,13120 ; 10825,12250 ccw(c10875,12250) 10925,12250 10925,12450 ccw(c10875,12450) 10825,12450 10825,12250 ; 10825,13120 ccw(c10875,13120) 10925,13120 10925,13320 ccw(c10875,13320) 10825,13320 10825,13120 ; 10984,9755 cw(c10984,9805) 10984,9855 11184,9855 cw(c11184,9805) 11184,9755 10984,9755 ; 10989,9345 cw(c10989,9395) 10989,9445 11189,9445 cw(c11189,9395) 11189,9345 10989,9345 ; 10994,10120 cw(c10994,10170) 10994,10220 11194,10220 cw(c11194,10170) 11194,10120 10994,10120 ; 11125,10375 11125,10425 12840,10425 12840,10375 11125,10375 ; 12539,9162 cw(c12539,9212) 12539,9262 12739,9262 cw(c12739,9212) 12739,9162 12539,9162 ; 12542,10122 cw(c12542,10172) 12542,10222 12742,10222 cw(c12742,10172) 12742,10122 12542,10122 ; 12547,9762 cw(c12547,9812) 12547,9862 12747,9862 cw(c12747,9812) 12747,9762 12547,9762 ; 12980,9156 cw(c12980,9206) 12980,9256 13180,9256 cw(c13180,9206) 13180,9156 12980,9156 ; 13003,10119 cw(c13003,10169) 13003,10219 13203,10219 cw(c13203,10169) 13203,10119 13003,10119 ; 13425,9065 13425,9775 13500,9775 13500,9065 13425,9065

## Silkscreen, mask and mechanical layers (free items; w line width, h text height)
Top Overlay:
  text "1" at 13375,12195 h30
  text "ACE DETECTORS" at 12216,12024 h30
Top Solder:
  circle w10: c14891,14307 r37.22
  text "Designed  by ACE DETECTORS" at 13642,15964 h60
  text "R" at 14906,14298 h30 r90
  text "USA" at 14975,14070 h60 r90
  text "VSS" at 10630,13416 h30 r90
  text "+11.5" at 10342,13379 h30 r90
  text "Pulse XP Digital" at 14999,12650 h72.8 r90
  text "." at 13270,12325 h180 r90
  text "AD1401" at 11263,11703 h48
  text "Headphones" at 14746,11566 h30
  text "V4.0" at 11252,11547 h48
  text "." at 14666,9765 h180 r90
  text "." at 11490,9405 h180 r90
Bottom Solder:
  text "06024015" at 13262,14580 h30 r90
  text "AD1401" at 10307,12037 h30 r90
  text "V4.0" at 10399,11528 h30

## Text inside footprints (layer, text, board x,y; h text height)
Balancer: Bottom Overlay "VSS" at 11716,16161 h60 r90; Bottom Overlay "VDD" at 12016,16161 h60 r90
D3: Top Overlay "K" at 13795,15220 h72.8